# Altium PCB NB3000XN.PcbDoc (part 28 of 71)
Units mil, origin at the board's own origin, x right, y up, seen from the top; angles counter-clockwise.
Board outline 9527.56 x 6929.77 mil, 6 copper layers (Top Layer, GND+SHIELD, MidLayer1, MidLayer2, P2 - 3V3+5V0, Bottom Layer), stack 62.375 mil thick; 832 components, 1027 nets, 4655 pads, 4981 vias.
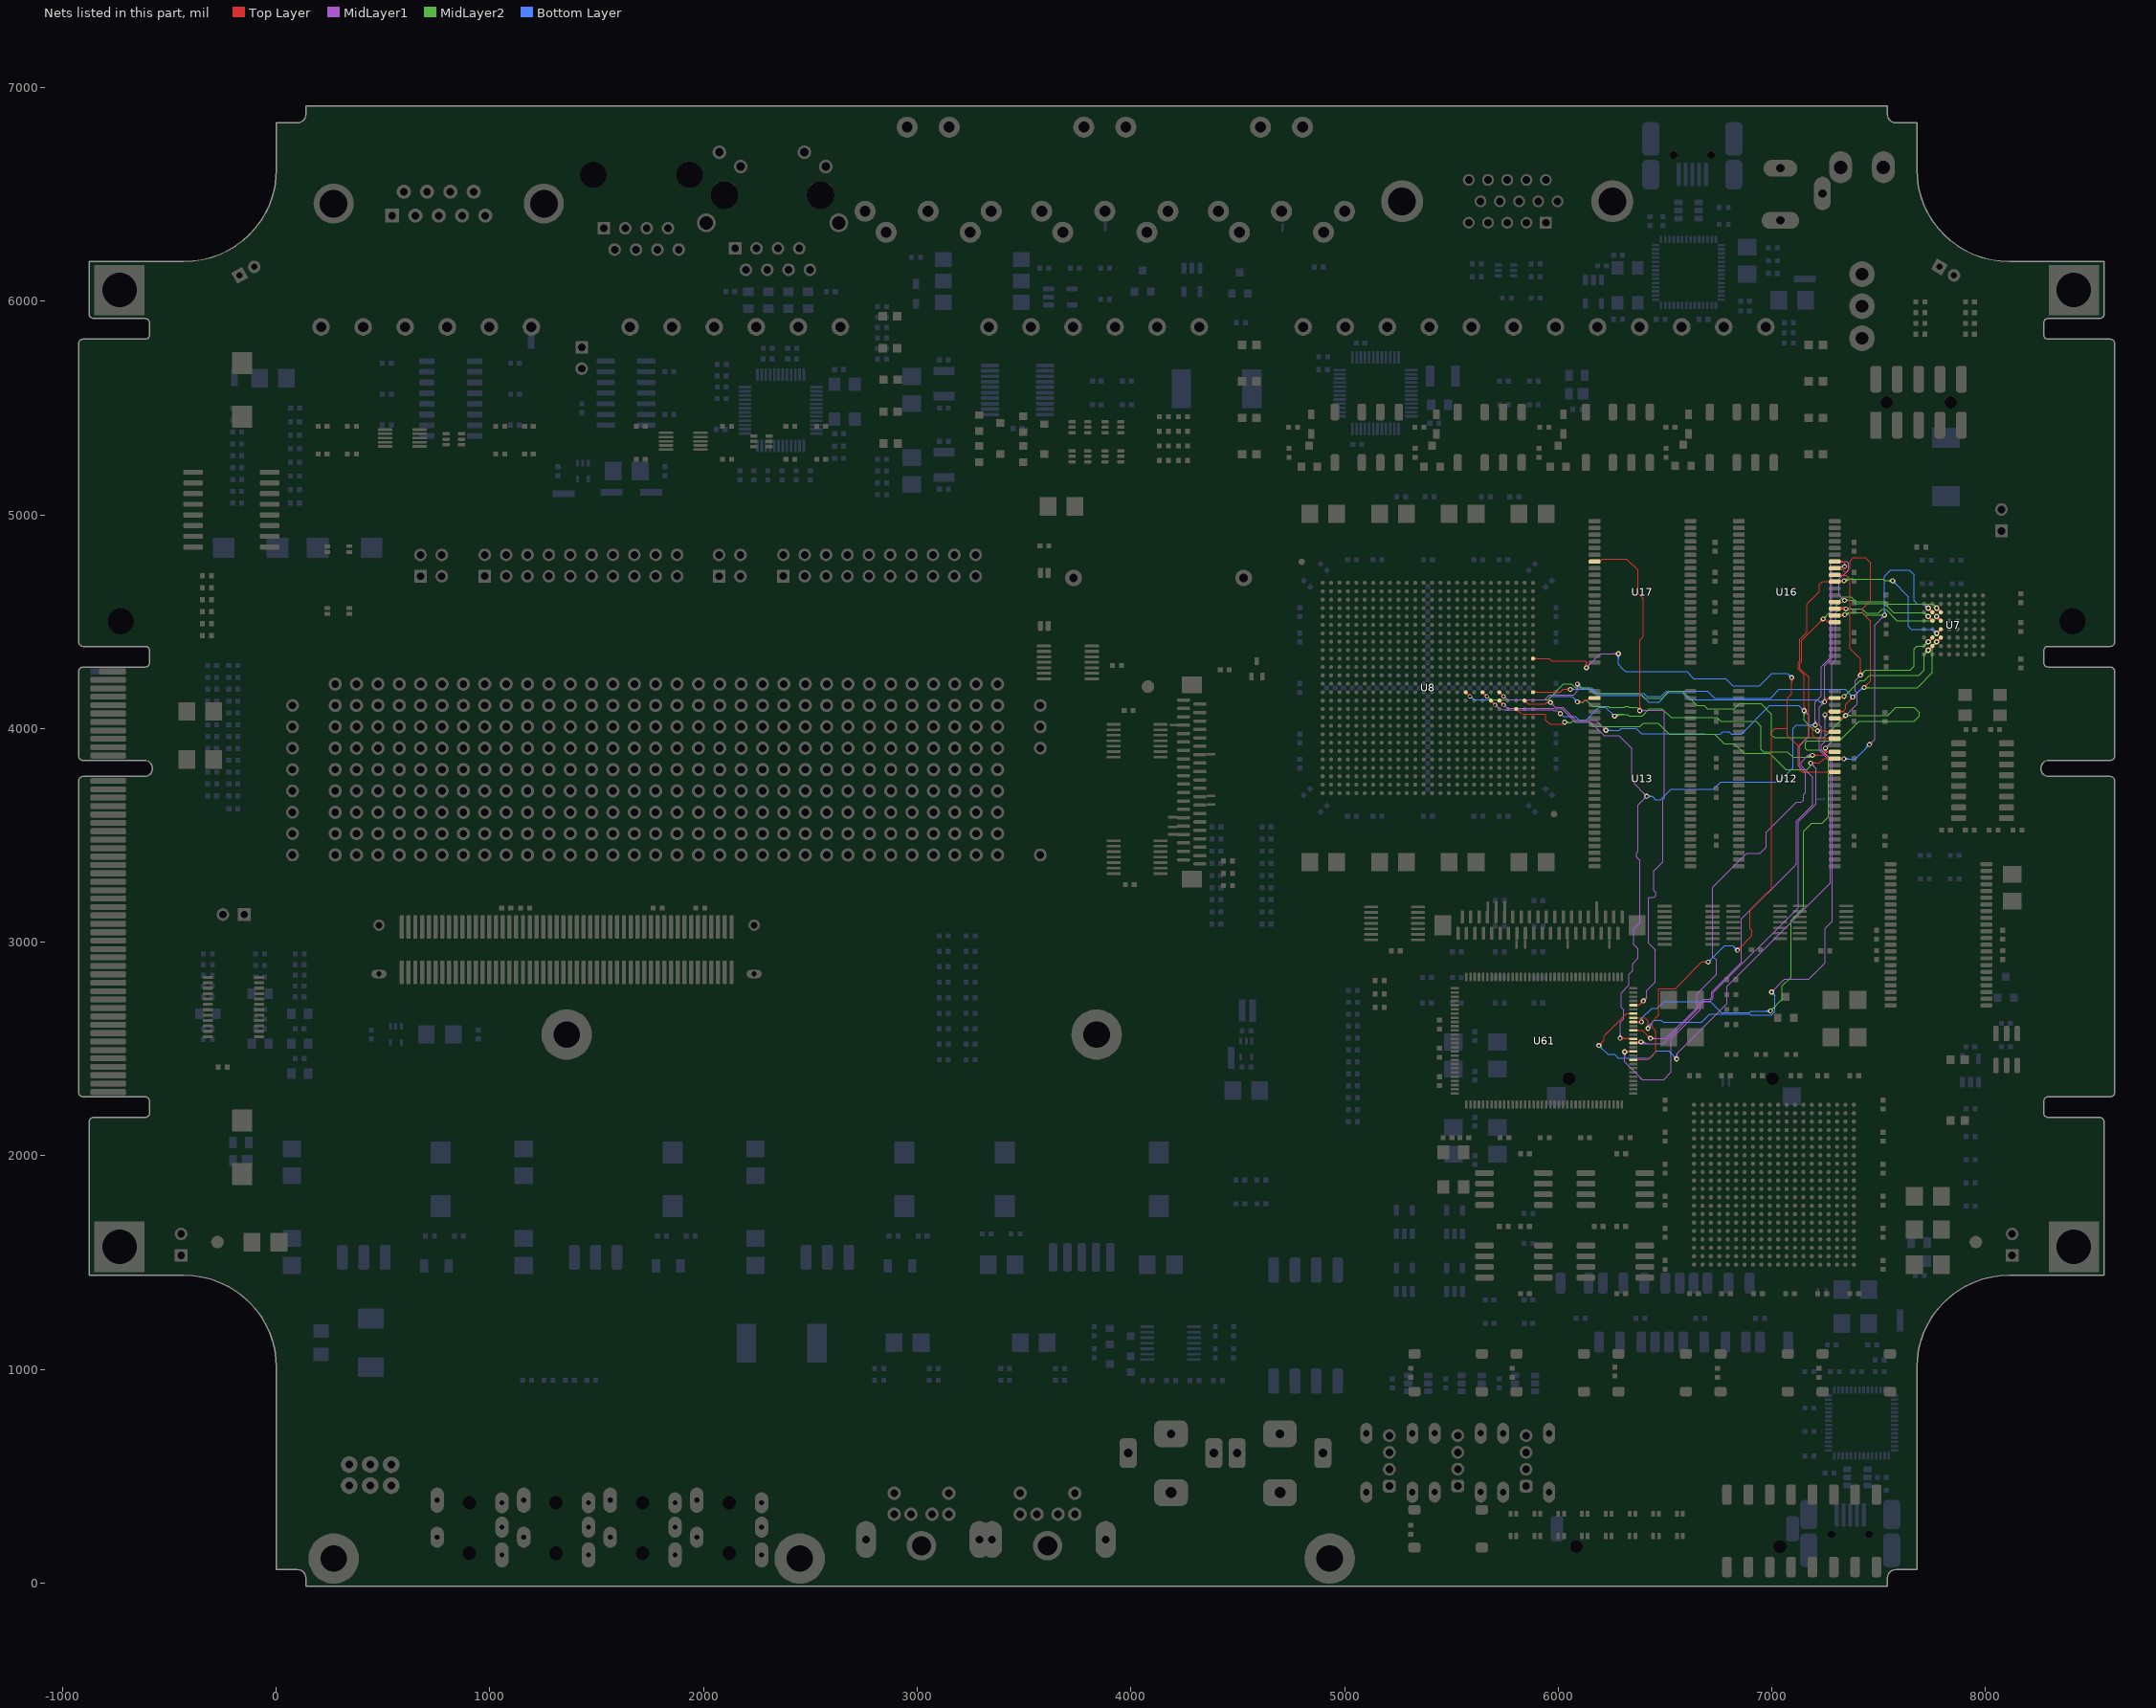
[diagram p32: the nets of this part, all layers, seen from the top]

## Via types
v1: diameter 23, hole 11.81, Top Layer to Bottom Layer, 3672 vias
v2: diameter 26, hole 11.81, Top Layer to Bottom Layer, 461 vias
v3: diameter 19, hole 11.81, Top Layer to Bottom Layer, tented both sides, 396 vias
v4: diameter 23.62, hole 11.81, Top Layer to Bottom Layer, 288 vias
v5: diameter 20, hole 11.81, Top Layer to Bottom Layer, 91 vias
v6: diameter 23, hole 11.81, Top Layer to Bottom Layer, tented both sides, 50 vias
v7: diameter 31, hole 11.81, Top Layer to Bottom Layer, 15 vias
v8: diameter 27.56, hole 11.81, Top Layer to Bottom Layer, tented both sides, 4 vias
v9: diameter 29, hole 11.81, Top Layer to Bottom Layer, 3 vias
v10: diameter 21, hole 11.81, Top Layer to Bottom Layer, 1 vias

## Nets (pads, with @x,y where several pads share a name; then routed paths per layer and width w, separated by ;. In a path a pad name is that pad's centre, name@x,y a point inside that pad or via, vN(x,y) a via of type N, cw(c..) or ccw(c..) an arc to the next point about the centre after c; other vN are vias at no path point) (continued)
DB_MEM.BUS_D8: U7.F3 U8.K26 U12.42 U16.29 U61.47 | length 6471.7
  Top Layer w4: U8.K26@5882.13,4327.8 5910,4327.8 5920,4327.8 5957.5,4327.8 5968.42,4316.87 6128.13,4316.87 6131.86,4313.14 v1(6131.86,4284.37) ; U8.K26@5887.43,4322.49 cw(c5900.23,4309.69) 5900.23,4327.8 cw(c5900.23,4345.9) U8.K26@5887.43,4333.1 ; v1@6125.14,4291.09 ccw(c6108.92,4307.31) 6131.86,4307.31 ccw(c6154.79,4307.31) v1@6138.57,4291.09 ; v1@6127.97,4288.26 ccw(c6118.58,4297.65) 6131.86,4297.65 ccw(c6145.14,4297.65) v1@6135.75,4288.26 ; U61.47@6356.86,2450.04 6420.04,2450.04 6456.86,2486.86 6456.86,2583.37 6440.19,2600.04 6440.19,2627.37 6471.19,2658.37 6471.19,2781.71 6472.86,2783.37 6548.52,2783.37 6672.52,2907.37 v1(6702.19,2907.37) ; U61.47@6367.95,2446.63 cw(c6376.19,2438.39) 6376.19,2450.04 ; U61.47@6367.95,2452.28 ccw(c6373.37,2457.7) 6373.37,2450.04 ; v1@6695.47,2900.66 ccw(c6679.26,2884.44) 6679.26,2907.37 ccw(c6679.26,2930.31) v1@6695.47,2914.09 ; v1@6698.3,2903.49 ccw(c6688.91,2894.1) 6688.91,2907.37 ccw(c6688.91,2920.65) v1@6698.3,2911.26 ; v1(6838.86,2962.37) 6906.86,3030.37 6906.86,3055 6898.52,3063.33 6898.52,3150.04 6998.52,3250.04 6998.52,3983.37 7015.19,4000.04 7073.52,4000.04 ; v1@6838.86,2967.87 ccw(c6838.86,2981.15) 6848.25,2971.76 ccw(c6857.64,2962.37) v1@6844.36,2962.37 ; v1@6838.86,2971.87 ccw(c6838.86,2994.81) 6855.07,2978.59 ccw(c6871.29,2962.37) v1@6848.36,2962.37 ; v1@7086.47,4231.99 cw(c7070.26,4215.77) 7093.19,4215.77 cw(c7116.13,4215.77) v1@7099.91,4231.99 ; v1@7089.3,4234.82 cw(c7079.91,4225.43) 7093.19,4225.43 cw(c7106.47,4225.43) v1@7097.08,4234.82 ; v1(7093.19,4238.71) 7093.19,4161.37 7073.52,4141.71 7073.52,4000.04 ; v1@7230.69,4513.04 cw(c7207.76,4513.04) 7223.97,4496.82 cw(c7240.19,4480.61) v1@7240.19,4503.54 ; v1@7234.69,4513.04 cw(c7221.41,4513.04) 7230.8,4503.65 cw(c7240.19,4494.26) v1@7240.19,4507.54 ; v1@7240.33,4511.55 cw(c7242.12,4492.78) 7255.45,4506.11 ; v1@7240.71,4507.57 cw(c7243.17,4481.82) 7261.46,4500.11 ; U16.29@7269.85,4494.4 ccw(c7263.3,4490.79) 7263.3,4498.27 ; U16.29@7269.85,4502.13 cw(c7263.3,4505.75) 7263.3,4498.27 ; U12.42@7271.19,3790.84 ccw(c7257.54,3777.18) 7257.54,3796.5 ccw(c7257.54,3815.81) U12.42@7271.19,3802.15 ; U12.42@7294.41,3796.5 7139.86,3796.5 7131.86,3804.5 7131.86,3908.37 ; U16.29@7294.41,4498.27 7263.3,4498.27 ; 5899.85,4327.8 ccw(c5899.85,4310.07) 5887.32,4322.6 cw(c5899.85,4310.07) 5899.85,4327.8 ; 5899.85,4327.8 cw(c5899.85,4345.52) 5887.32,4332.99 ccw(c5899.85,4345.52) 5899.85,4327.8 ; 7073.52,4000.04 7073.52,3966.71 7123.19,3917.04 ; 7123.19,3917.04 7131.86,3908.37 ; 7123.19,3917.04 7131.86,3908.37 ; 7123.19,3917.04 7173.52,3967.37 7173.52,4240.04 7131.86,4281.71 7131.86,4306.04 7140.19,4314.37 7140.19,4413.04 v1(7240.19,4513.04) 7248.52,4513.04 7263.3,4498.27
  Top Layer w8: v2@7771.26,4554.74 cw(c7771.26,4533.01) 7786.62,4548.38 cw(c7801.99,4563.74) v2@7780.26,4563.74 ; v2(7771.26,4563.74) U7.F3@7790.95,4544.06 ; U7.F3@7784.95,4544.06 ccw(c7770.46,4544.06) 7780.7,4554.3 ccw(c7790.95,4564.54) U7.F3@7790.95,4550.06
  MidLayer1 w4: v1(6131.86,4284.37) 6197.52,4350.04 v1(6281.86,4350.04) ; v1@6131.86,4289.87 ccw(c6131.86,4303.15) 6141.25,4293.76 ccw(c6150.64,4284.37) v1@6137.36,4284.37 ; v1@6131.86,4293.87 ccw(c6131.86,4316.81) 6148.07,4300.59 ccw(c6164.29,4284.37) v1@6141.36,4284.37 ; v1@6275.14,4343.32 ccw(c6258.92,4327.11) 6258.92,4350.04 ccw(c6258.92,4372.98) v1@6275.14,4356.76 ; v1@6277.97,4346.15 ccw(c6268.58,4336.76) 6268.58,4350.04 ccw(c6268.58,4363.32) v1@6277.97,4353.93
  MidLayer2 w4: v1(7240.19,4513.04) 7316.14,4588.99 7316.14,4601.99 7331.86,4617.71 7370.61,4617.71 7394.61,4593.71 7531.23,4593.71 7541.57,4583.37 7751.63,4583.37 v2(7771.26,4563.74) ; v1@7240.19,4518.54 ccw(c7240.19,4531.82) 7249.58,4522.43 ccw(c7258.97,4513.04) v1@7245.69,4513.04 ; v1@7240.19,4522.54 ccw(c7240.19,4545.48) 7256.41,4529.26 ccw(c7272.63,4513.04) v1@7249.69,4513.04 ; v2@7760.26,4563.74 ccw(c7733.7,4563.74) 7752.48,4582.52 ccw(c7771.26,4601.3) v2@7771.26,4574.74 ; v2@7764.26,4563.74 ccw(c7747.36,4563.74) 7759.31,4575.69 ccw(c7771.26,4587.64) v2@7771.26,4570.74
  Bottom Layer w4: v1@6275.14,4343.32 cw(c6258.92,4327.11) 6281.86,4327.11 cw(c6304.79,4327.11) v1@6288.57,4343.32 ; v1@6277.97,4346.15 cw(c6268.58,4336.76) 6281.86,4336.76 cw(c6295.14,4336.76) v1@6285.75,4346.15 ; v1(6281.86,4350.04) 6281.86,4300.04 6298.52,4283.37 6315.52,4266.37 6602.19,4266.37 6634.19,4234.37 6783.84,4234.37 6818.17,4200.04 6941.86,4200.04 7000.19,4258.37 7073.52,4258.37 v1(7093.19,4238.71) ; v1(6702.19,2907.37) 6774.52,2979.71 6778.52,2983.71 6817.52,2983.71 v1(6838.86,2962.37) ; v1@6702.19,2912.87 ccw(c6702.19,2926.15) 6711.58,2916.76 ccw(c6720.97,2907.37) v1@6707.69,2907.37 ; v1@6702.19,2916.87 ccw(c6702.19,2939.81) 6718.41,2923.59 ccw(c6734.63,2907.37) v1@6711.69,2907.37 ; v1@6829.36,2962.37 ccw(c6806.42,2962.37) 6822.64,2978.59 ccw(c6838.86,2994.81) v1@6838.86,2971.87 ; v1@6833.36,2962.37 ccw(c6820.08,2962.37) 6829.47,2971.76 ccw(c6838.86,2981.15) v1@6838.86,2967.87 ; v1@7083.69,4238.71 ccw(c7060.76,4238.71) 7076.97,4254.93 ccw(c7093.19,4271.14) v1@7093.19,4248.21 ; v1@7087.69,4238.71 ccw(c7074.41,4238.71) 7083.8,4248.1 ccw(c7093.19,4257.49) v1@7093.19,4244.21
DB_MEM.BUS_D9: U7.G3 U8.T24 U12.44 U16.30 U61.49 | length 6555.2
  Top Layer w4: U8.T24@5803.39,4084.23 cw(c5803.39,4066.51) 5815.92,4079.04 ; U8.T24@5810.73,4091.57 ccw(c5828.45,4091.57) 5815.92,4079.04 ; v1(6030,4030) 6020,4020 5961.9,4020 5942.36,4039.54 5942.36,4063.22 5937.86,4067.71 5920,4067.71 5910,4067.71 5843.27,4067.71 cw(c5843.27,4106.39) 5815.92,4079.04 ; v1(6311.19,2487.04) 6312.98,2488.83 U61.49@6351.93,2488.83 ; v1@6315.08,2483.15 cw(c6328.78,2469.45) 6328.78,2488.83 ; v1@6317.91,2480.32 cw(c6338.43,2459.8) U61.49@6338.43,2488.83 ; v1@6317.91,2493.76 ccw(c6329.82,2505.67) 6329.82,2488.83 ; U61.49@6335.91,2486 ccw(c6329.08,2479.17) 6329.08,2488.83 ccw(c6329.08,2498.48) U61.49@6335.91,2491.65 ; v1(7181.86,3838.71) 7223.71,3838.71 7244.49,3859.49 U12.44@7294.41,3859.49 ; v1@7185.75,3834.82 cw(c7195.14,3825.43) 7195.14,3838.71 cw(c7195.14,3851.99) v1@7185.75,3842.6 ; v1@7188.57,3831.99 cw(c7204.79,3815.77) 7204.79,3838.71 cw(c7204.79,3861.64) v1@7188.57,3845.43 ; U12.44@7271.19,3853.83 ccw(c7257.54,3840.17) 7257.54,3859.49 ccw(c7257.54,3878.8) U12.44@7271.19,3865.15 ; U12.44@7291.3,3859.49 7332.52,3859.49 7333.64,3858.37 v1(7337.52,3858.37) ; U16.30@7294.41,4529.76 7335.14,4529.76 7340.52,4524.37 v1(7340.52,4532.71) ; U16.30@7310.48,4529.76 ccw(c7310.48,4562.75) v1@7333.81,4539.43 ; U12.44@7311.9,3859.49 cw(c7311.9,3832.75) v1@7330.81,3851.66 ; U12.44@7317.28,3859.49 ccw(c7317.28,3878.62) v1@7330.81,3865.09 ; U12.44@7317.63,3853.83 cw(c7331.28,3840.18) 7331.28,3859.49 cw(c7331.28,3878.8) U12.44@7317.63,3865.15 ; U16.30@7317.63,4524.11 cw(c7331.28,4510.45) 7331.28,4529.76 cw(c7331.28,4549.08) U16.30@7317.63,4535.42 ; U16.30@7320.14,4529.76 ccw(c7320.14,4553.09) v1@7336.64,4536.6 ; U12.44@7321.56,3859.49 cw(c7321.56,3842.41) v1@7333.64,3854.49 ; 7324.7,4529.76 cw(c7324.7,4516.88) v1@7333.81,4525.99
  Top Layer w8: v2@7731.89,4554.74 cw(c7731.89,4533.01) 7747.25,4548.38 cw(c7762.62,4563.74) v2@7740.89,4563.74 ; v2(7731.89,4563.74) U7.G3@7751.58,4544.06 ; U7.G3@7745.58,4544.06 ccw(c7731.09,4544.06) 7741.33,4554.3 ccw(c7751.58,4564.54) U7.G3@7751.58,4550.06
  MidLayer1 w4: v1@6304.47,2480.32 cw(c6288.26,2464.11) 6311.19,2464.11 cw(c6334.13,2464.11) v1@6317.91,2480.32 ; v1@6306.86,2482.71 v1(6311.19,2487.04) 6311.19,2438.81 6391.63,2358.37 ; v1@6307.3,2483.15 cw(c6297.91,2473.76) 6311.19,2473.76 cw(c6324.47,2473.76) v1@6315.08,2483.15 ; 6381.4,2368.6 6391.96,2358.04 6493.88,2358.04 6529.19,2393.35 6529.19,2547.37 6665.19,2683.37 6665.19,2705.39 6685.17,2725.37 6712.84,2725.37 ; 6695.19,2725.04 6712.5,2725.04 6712.84,2725.37 ; v1@7181.86,3829.21 cw(c7181.86,3806.27) 7198.07,3822.49 cw(c7214.29,3838.71) v1@7191.36,3838.71 ; v1@7181.86,3833.21 cw(c7181.86,3819.93) 7191.25,3829.32 cw(c7200.64,3838.71) v1@7187.36,3838.71 ; v1(7181.86,3838.71) 7206.86,3813.71 7206.86,3670 7206.86,3647.06 7123.52,3563.73 7123.52,3541.71 7123.52,3535 7123.52,3161.37 6725.86,2763.71 6725.86,2738.39 6712.84,2725.37 ; v1(7456.86,3925.04) 7481.86,3950.04 7481.86,4484.71 v1(7527.86,4530.71) ; v1@7456.86,3930.54 ccw(c7456.86,3943.82) 7466.25,3934.43 ccw(c7475.64,3925.04) v1@7462.36,3925.04 ; v1@7456.86,3934.54 ccw(c7456.86,3957.48) 7473.07,3941.26 ccw(c7489.29,3925.04) v1@7466.36,3925.04 ; v1@7518.36,4530.71 cw(c7495.42,4530.71) 7511.64,4514.49 cw(c7527.86,4498.27) v1@7527.86,4521.21 ; v1@7522.36,4530.71 cw(c7509.08,4530.71) 7518.47,4521.32 cw(c7527.86,4511.93) v1@7527.86,4525.21
  MidLayer2 w4: v1(6030,4030) 6040,4030 6041.29,4028.71 6060.52,4028.71 6065.19,4033.37 6140.19,4033.37 6163.19,4010.37 6382.52,4010.37 6397.52,4025.37 6467.67,4025.37 6518.33,3974.71 6732.19,3974.71 6776.9,3930 6825,3930 6871.63,3883.37 6990.19,3883.37 7065.19,3808.37 7165.19,3808.37 7181.86,3825.04 v1(7181.86,3838.71) ; v1@6033.89,4033.89 ccw(c6046.4,4046.4) 6046.4,4028.71 ; v1@6036.72,4023.28 cw(c6049.82,4010.18) 6049.82,4028.71 ; v1@6036.72,4036.72 ccw(c6056.05,4056.05) 6056.05,4028.71 ; v1@7338.76,4534.48 cw(c7356.22,4517.02) 7356.22,4541.71 ; v1(7340.52,4532.71) 7349.52,4541.71 7423.52,4541.71 7434.52,4530.71 v1(7527.86,4530.71) ; v1@7341.58,4531.65 cw(c7365.87,4507.36) 7365.87,4541.71 ; v1@7344.41,4528.82 cw(c7375.53,4497.7) 7375.53,4541.71 ; v1@7347.24,4525.99 cw(c7385.19,4488.04) 7385.19,4541.71 ; v1@7521.14,4523.99 ccw(c7504.92,4507.77) 7504.92,4530.71 ccw(c7504.92,4553.64) v1@7521.14,4537.43 ; v1@7523.97,4526.82 ccw(c7514.58,4517.43) 7514.58,4530.71 ccw(c7514.58,4543.99) v1@7523.97,4534.6
  Bottom Layer w4: v1(7337.52,3858.37) 7390.19,3858.37 v1(7456.86,3925.04) ; v1@7341.41,3854.49 cw(c7350.8,3845.1) 7350.8,3858.37 cw(c7350.8,3871.65) v1@7341.41,3862.26 ; v1@7344.24,3851.66 cw(c7360.46,3835.44) 7360.46,3858.37 cw(c7360.46,3881.31) v1@7344.24,3865.09 ; v1@7447.36,3925.04 cw(c7424.42,3925.04) 7440.64,3908.82 cw(c7456.86,3892.61) v1@7456.86,3915.54 ; v1@7451.36,3925.04 cw(c7438.08,3925.04) 7447.47,3915.65 cw(c7456.86,3906.26) v1@7456.86,3919.54 ; v1@7521.14,4537.43 ccw(c7504.92,4553.64) 7527.86,4553.64 ccw(c7550.79,4553.64) v1@7534.57,4537.43 ; v1@7523.97,4534.6 ccw(c7514.58,4543.99) 7527.86,4543.99 ccw(c7541.14,4543.99) v1@7531.75,4534.6 ; v1(7527.86,4530.71) 7527.86,4712.71 7556.86,4741.71 7644.19,4741.71 7665.19,4720.71 7665.19,4597.71 7679.52,4583.37 7712.26,4583.37 v2(7731.89,4563.74) ; v2@7720.89,4563.74 ccw(c7694.33,4563.74) 7713.11,4582.52 ccw(c7731.89,4601.3) v2@7731.89,4574.74 ; v2@7724.89,4563.74 ccw(c7707.99,4563.74) 7719.94,4575.69 ccw(c7731.89,4587.64) v2@7731.89,4570.74
DB_MEM.BUS_D10: U7.F4 U8.R21 U12.45 U16.31 U61.51 | length 6324.8
  Top Layer w4: U8.R21@5685.28,4123.44 cw(c5685.28,4105.34) 5698.08,4118.14 cw(c5710.88,4130.94) U8.R21@5692.78,4130.94 ; U8.R21@5685.28,4123.6 cw(c5685.28,4105.88) 5697.81,4118.41 cw(c5710.34,4130.94) U8.R21@5692.62,4130.94 ; U8.R21@5685.28,4130.94 v3(5704.96,4111.26) ; U61.51@6361.54,2528.2 ccw(c6361.54,2558.84) v1@6383.29,2537.25 ; U61.51@6367.95,2525.37 cw(c6374.78,2518.54) 6374.78,2528.2 cw(c6374.78,2537.85) U61.51@6367.95,2531.02 ; 6371.15,2528.2 ccw(c6371.15,2549.3) v1@6386.13,2534.43 ; 6376.76,2528.2 cw(c6376.76,2522.94) v1@6380.47,2526.66 ; v1@6380.45,2540.07 cw(c6351.93,2568.37) U61.51@6351.93,2528.2 v1@6384.04,2528.2 ; v1(7190.19,3875.04) 7241.25,3875.04 7250.52,3884.32 ; v1@7194.08,3871.15 cw(c7203.47,3861.76) 7203.47,3875.04 cw(c7203.47,3888.32) v1@7194.08,3878.93 ; v1@7196.91,3868.32 cw(c7213.13,3852.11) 7213.13,3875.04 cw(c7213.13,3897.98) v1@7196.91,3881.76 ; v1@7243.81,3901.66 cw(c7227.59,3885.44) 7250.52,3885.44 cw(c7273.46,3885.44) v1@7257.24,3901.66 ; v1@7246.64,3904.49 cw(c7237.25,3895.1) 7250.52,3895.1 cw(c7263.8,3895.1) v1@7254.41,3904.49 ; v1(7250.52,3908.37) 7250.52,3884.32 ; U12.45@7271.19,3885.33 ccw(c7257.54,3871.67) 7257.54,3890.98 ccw(c7257.54,3910.3) U12.45@7271.19,3896.64 ; U12.45@7294.41,3890.98 7257.19,3890.98 7250.52,3884.32 ; U16.31@7299.86,4566.71 v1@7340.52,4566.71 ; U16.31@7308.16,4566.71 cw(c7308.16,4521.01) v1@7340.47,4553.32 ; U16.31@7311.97,4561.26 cw(c7323.54,4551.7) 7323.54,4566.71 ; U16.31@7315.05,4558.71 cw(c7332.03,4544.69) 7332.03,4566.71 ; U16.31@7317.82,4566.71 cw(c7317.82,4530.67) v1@7343.3,4556.15 ; U16.31@7318.14,4556.16 cw(c7340.52,4537.67) v1@7340.52,4566.71 ; 7327.47,4566.71 cw(c7327.47,4540.32) v1@7346.13,4558.98 ; 7337.13,4566.71 cw(c7337.13,4549.98) v1@7348.96,4561.81 ; v1(7347.19,4560.04) v1@7340.52,4566.71 ; 5692.16,4124.06 cw(c5679.35,4111.26) 5697.46,4111.26 ccw(c5679.35,4111.26) 5692.16,4124.06 ; 5692.16,4124.06 ccw(c5704.96,4136.87) 5704.96,4118.76 cw(c5704.96,4136.87) 5692.16,4124.06
  Top Layer w8: v2@7771.26,4515.37 cw(c7771.26,4493.64) 7786.62,4509.01 cw(c7801.99,4524.37) v2@7780.26,4524.37 ; v2(7771.26,4524.37) U7.F4@7790.95,4504.69 ; U7.F4@7784.95,4504.69 ccw(c7770.46,4504.69) 7780.7,4514.93 ccw(c7790.95,4525.17) U7.F4@7790.95,4510.69
  MidLayer1 w4: v3@5705.61,4103.79 cw(c5707.19,4085.75) 5718.83,4099.62 ; v3@5712.43,4111.91 ccw(c5730.47,4113.49) 5718.83,4099.62 ; 5781.77,4087.4 5767.84,4087.4 ; v1@6010.54,4071.35 6010,4070.81 v1(6010,4070) 5996.29,4083.71 5979.9,4083.71 5976.21,4087.4 5924.74,4087.4 5920,4087.4 5910,4087.4 5861.38,4087.4 5841.96,4087.4 5767.84,4087.4 ; v1@6385.42,2531.61 ccw(c6401.27,2547.46) 6401.27,2525.04 ; v1(6387.19,2533.37) 6395.52,2525.04 6491.86,2525.04 6656.86,2690.04 6656.86,2708.37 6681.86,2733.37 6709.52,2733.37 6717.86,2741.71 6717.86,2767.02 6856.86,2906.02 6856.86,3108.37 7098.52,3350.04 7115.52,3367.04 7115.52,3567.04 ; v1@6388.25,2534.44 ccw(c6410.93,2557.12) 6410.93,2525.04 ; v1@6391.08,2537.26 ccw(c6420.59,2566.77) 6420.59,2525.04 ; v1@6393.91,2540.09 ccw(c6430.25,2576.43) 6430.25,2525.04 ; v1@7182.9,3868.95 ccw(c7169.86,3858.03) 7169.86,3875.04 ; v1@7182.9,3881.14 cw(c7169.86,3892.05) 7169.86,3875.04 ; v1@7185.97,3871.51 ccw(c7178.42,3865.19) 7178.42,3875.04 ccw(c7178.42,3884.89) v1@7185.97,3878.57 ; v1(7190.19,3875.04) 7169.86,3875.04 ; v1(7250.52,3908.37) 7281.86,3939.71 7281.86,4303.33 7298.52,4320 7298.52,4541.71 7316.86,4560.04 v1(7347.19,4560.04) ; v1@7250.52,3913.87 ccw(c7250.52,3927.15) 7259.91,3917.76 ccw(c7269.3,3908.37) v1@7256.02,3908.37 ; v1@7250.52,3917.87 ccw(c7250.52,3940.81) 7266.74,3924.59 ccw(c7282.96,3908.37) v1@7260.02,3908.37 ; v1@7340.47,4553.32 ccw(c7324.26,4537.11) 7324.26,4560.04 ccw(c7324.26,4582.98) v1@7340.47,4566.76 ; v1@7343.3,4556.15 ccw(c7333.91,4546.76) 7333.91,4560.04 ccw(c7333.91,4573.32) v1@7343.3,4563.93 ; 5718.83,4099.62 ccw(c5748.34,4129.13) 5748.34,4087.4 5767.84,4087.4 ; 7115.52,3567.04 7190.19,3641.71 ; 7115.52,3567.04 7190.19,3641.71 ; 7169.86,3875.04 7136.52,3841.71 7136.52,3825.04 7190.19,3771.37 7190.19,3641.71
  MidLayer2 w4: v1@6262.42,4060.14 cw(c6278.27,4044.29) 6278.27,4066.71 ; v1(6264.19,4058.37) 6272.52,4066.71 6323.52,4066.71 6330.23,4060 6393.52,4060 6425.91,4092.38 6486.54,4092.38 6527.54,4051.37 6685,4051.37 6743.86,4051.37 6761.86,4033.37 6926.63,4033.37 6950,4010 6950,3901.71 6960,3891.71 7073.52,3891.71 7098.52,3866.71 7181.86,3866.71 v1(7190.19,3875.04) ; v1@6265.25,4057.31 cw(c6287.93,4034.64) 6287.93,4066.71 ; v1@6268.08,4054.49 cw(c6297.59,4024.98) 6297.59,4066.71 ; v1@6270.91,4051.66 cw(c6307.24,4015.32) 6307.24,4066.71 ; 7147.14,3866.71 ccw(c7147.14,3918.09) v1@7183.47,3881.76 ; 7156.79,3866.71 ccw(c7156.79,3908.44) v1@7186.3,3878.93 ; 7166.45,3866.71 ccw(c7166.45,3898.78) v1@7189.13,3876.1 ; 7176.11,3866.71 ccw(c7176.11,3889.12) v1@7191.96,3873.27 ; v1(7347.19,4560.04) 7421.86,4560.04 7441.52,4540.37 7497.19,4540.37 7515.04,4558.23 7532.77,4558.23 7585.96,4505.04 7760.19,4505.04 7765.19,4510.04 v2@7765.19,4524.37 ; v1@7351.08,4556.15 cw(c7360.47,4546.76) 7360.47,4560.04 cw(c7360.47,4573.32) v1@7351.08,4563.93 ; v1@7353.91,4553.32 cw(c7370.13,4537.11) 7370.13,4560.04 cw(c7370.13,4582.98) v1@7353.91,4566.76
  Bottom Layer w4: v1(6010,4070) 6010,4070.81 6010.54,4071.35 6024.71,4057.19 6079.71,4057.19 6095.19,4041.71 6131.86,4041.71 6190.19,4100.04 6222.52,4100.04 v1(6264.19,4058.37) ; v1@6254.69,4058.37 ccw(c6231.76,4058.37) 6247.97,4074.59 ccw(c6264.19,4090.81) v1@6264.19,4067.87 ; v1@6258.69,4058.37 ccw(c6245.41,4058.37) 6254.8,4067.76 ccw(c6264.19,4077.15) v1@6264.19,4063.87
DB_MEM.BUS_D11: U7.G4 U8.R22 U12.47 U16.32 U61.52 | length 5865.6
  Top Layer w4: U8.R22@5724.65,4123.44 cw(c5724.65,4105.34) 5737.45,4118.14 cw(c5750.25,4130.94) U8.R22@5732.15,4130.94 ; U8.R22@5724.65,4123.6 cw(c5724.65,4105.88) 5737.18,4118.41 cw(c5749.71,4130.94) U8.R22@5731.99,4130.94 ; U8.R22@5724.65,4130.94 v3(5744.33,4111.26) ; v1(6290.19,2550.04) U61.52@6351.93,2550.04 ; v1@6294.08,2546.15 cw(c6303.47,2536.76) 6303.47,2550.04 cw(c6303.47,2563.32) v1@6294.08,2553.93 ; v1@6296.91,2543.32 cw(c6313.13,2527.11) 6313.13,2550.04 cw(c6313.13,2572.98) v1@6296.91,2556.76 ; 6323.87,2550.04 cw(c6323.87,2533.01) U61.52@6335.91,2545.05 ; v1(7203.52,4016.71) 7190.19,4003.37 7190.19,3969.81 7206.02,3953.98 U12.47@7294.41,3953.98 ; U12.47@7271.19,3948.32 ccw(c7257.54,3934.66) 7257.54,3953.98 ccw(c7257.54,3973.29) U12.47@7271.19,3959.63 ; U16.32@7294.41,4592.76 7323.14,4592.76 ; U16.32@7311.97,4592.76 cw(c7317.53,4586.17) 7323.64,4592.26 ; U16.32@7319.54,4590.18 cw(c7323.14,4588.95) 7323.14,4592.76 ; U16.32@7319.54,4595.33 ccw(c7323.14,4596.56) 7323.14,4592.76 ; v1(7340.19,4600.04) 7331.86,4591.71 7324.19,4591.71 7323.14,4592.76 ; 5731.53,4124.06 cw(c5718.72,4111.26) 5736.83,4111.26 ccw(c5718.72,4111.26) 5731.53,4124.06 ; 5731.53,4124.06 ccw(c5744.33,4136.87) 5744.33,4118.76 cw(c5744.33,4136.87) 5731.53,4124.06
  Top Layer w8: v2@7731.89,4515.37 cw(c7731.89,4493.64) 7747.25,4509.01 cw(c7762.62,4524.37) v2@7740.89,4524.37 ; v2(7731.89,4524.37) U7.G4@7751.58,4504.69 ; U7.G4@7745.58,4504.69 ccw(c7731.09,4504.69) 7741.33,4514.93 ccw(c7751.58,4525.17) U7.G4@7751.58,4510.69
  MidLayer1 w4: v3@5744.98,4103.79 cw(c5746.56,4085.75) 5758.2,4099.62 cw(c5769.84,4113.49) v3@5751.8,4111.91 ; 5757.91,4099.87 ccw(c5767.84,4109.8) 5767.84,4095.75 5861.38,4095.75 5910,4095.75 5920,4095.75 5924.74,4095.75 5979.17,4095.75 5983.21,4091.71 6018.52,4091.71 6073.66,4036.57 6080.36,4029.87 6152.75,4029.87 6195.62,3987.01 6195.62,3986.28 6215.19,3966.71 6283.86,3966.71 6344.52,3906.04 6344.52,3754.04 v1(6415.19,3683.37) 6373.52,3641.71 6373.52,3425.04 6367.19,3418.71 6367.19,3397.81 6382.86,3382.14 6382.86,3091.71 6353.52,3062.37 6353.52,2989.08 6373.52,2969.08 6373.52,2925.04 6348.52,2900.04 6348.52,2866.71 6331.86,2850.04 6331.86,2800.04 6295,2763.18 6295,2695.23 6306.86,2683.37 6306.86,2641.71 6290.19,2625.04 v1(6290.19,2550.04) ; v1@6283.47,2556.76 ccw(c6267.26,2572.98) 6290.19,2572.98 ccw(c6313.13,2572.98) v1@6296.91,2556.76 ; v1@6286.3,2553.93 ccw(c6276.91,2563.32) 6290.19,2563.32 ccw(c6303.47,2563.32) v1@6294.08,2553.93 ; v1@6415.19,3673.87 ccw(c6415.19,3650.94) 6398.97,3667.16 ccw(c6382.76,3683.37) 6405.69,3683.37 ccw(c6382.76,3683.37) 6398.97,3699.59 ccw(c6415.19,3715.81) v1@6415.19,3692.87 ; v1@6415.19,3677.87 ccw(c6415.19,3664.6) 6405.8,3673.99 ccw(c6396.41,3683.37) 6409.69,3683.37 ccw(c6396.41,3683.37) 6405.8,3692.76 ccw(c6415.19,3702.15) v1@6415.19,3688.87 ; v1@7196.81,4023.43 ccw(c7180.59,4039.64) 7203.52,4039.64 ccw(c7226.46,4039.64) v1@7210.24,4023.43 ; v1@7199.64,4020.6 ccw(c7190.25,4029.99) 7203.52,4029.99 ccw(c7216.8,4029.99) v1@7207.41,4020.6 ; v1(7203.52,4016.71) 7203.52,4125.04 7231.86,4153.37 7231.86,4290.37 7273.52,4332.04 7273.52,4768.04 7288.86,4783.37 7349.86,4783.37 7358.19,4775.04 7358.19,4741.71 7315.19,4698.71 7315.19,4625.04 v1(7340.19,4600.04) ; v1@7330.69,4600.04 ccw(c7307.76,4600.04) 7323.97,4616.26 ccw(c7340.19,4632.48) v1@7340.19,4609.54 ; v1@7334.69,4600.04 ccw(c7321.41,4600.04) 7330.8,4609.43 ccw(c7340.19,4618.82) v1@7340.19,4605.54
  MidLayer2 w4: v1(7340.19,4600.04) 7372,4600.04 7377,4600 7391.29,4585.71 7527.92,4585.71 7569.92,4543.71 7712.55,4543.71 v2(7731.89,4524.37) ; v1@7344.08,4596.15 cw(c7353.47,4586.76) 7353.47,4600.04 cw(c7353.47,4613.32) v1@7344.08,4603.93 ; v1@7346.91,4593.32 cw(c7363.13,4577.11) 7363.13,4600.04 cw(c7363.13,4622.98) v1@7346.91,4606.76 ; v2@7720.89,4524.37 ccw(c7694.33,4524.37) 7713.11,4543.15 ccw(c7731.89,4561.93) v2@7731.89,4535.37 ; v2@7724.89,4524.37 ccw(c7707.99,4524.37) 7719.94,4536.32 ccw(c7731.89,4548.27) v2@7731.89,4531.37
  Bottom Layer w4: v1(6415.19,3683.37) 6440.19,3683.37 6455.48,3668.09 6479.55,3668.09 6527.5,3716.04 6725.84,3716.04 6760.5,3750.71 7032.52,3750.71 7098.52,3816.71 7098.52,4000.04 7115.19,4016.71 v1(7203.52,4016.71) ; v1@6419.08,3679.49 cw(c6428.47,3670.1) 6428.47,3683.37 cw(c6428.47,3696.65) v1@6419.08,3687.26 ; v1@6421.91,3676.66 cw(c6438.13,3660.44) 6438.13,3683.37 cw(c6438.13,3706.31) v1@6421.91,3690.09 ; v1@7196.81,4009.99 ccw(c7180.59,3993.77) 7180.59,4016.71 ccw(c7180.59,4039.64) v1@7196.81,4023.43 ; v1@7199.64,4012.82 ccw(c7190.25,4003.43) 7190.25,4016.71 ccw(c7190.25,4029.99) v1@7199.64,4020.6
DB_MEM.BUS_D12: U7.F5 U8.R25 U12.48 U16.35 U61.54 | length 6312.6
  Top Layer w4: U8.R25@5842.76,4123.6 cw(c5842.76,4105.88) 5855.29,4118.41 ; U8.R25@5850.1,4130.94 ccw(c5867.83,4130.94) 5855.29,4118.41 ; v1@5955.85,4117.26 ccw(c5946.52,4111.31) 5946.52,4122.37 ; v1@5955.85,4127.49 cw(c5946.52,4133.44) 5946.52,4122.37 ; v1(5963.86,4122.37) 5946.52,4122.37 ; U61.54@6351.93,2587.25 6394.65,2587.25 v1(6431.86,2550.04) v1@6431.86,2558.37 ; U61.54@6367.95,2584.42 cw(c6374.78,2577.59) 6374.78,2587.25 cw(c6374.78,2596.91) U61.54@6367.95,2590.08 ; v1@6422.36,2550.04 ccw(c6399.42,2550.04) 6415.64,2566.26 ccw(c6431.86,2582.48) v1@6431.86,2559.54 ; v1@6426.36,2550.04 ccw(c6413.08,2550.04) 6422.47,2559.43 ccw(c6431.86,2568.82) v1@6431.86,2555.54 ; v1@7144.81,4090.09 ccw(c7128.59,4106.31) 7151.52,4106.31 ccw(c7174.46,4106.31) v1@7158.24,4090.09 ; v1@7147.64,4087.26 ccw(c7138.25,4096.65) 7151.52,4096.65 ccw(c7164.8,4096.65) v1@7155.41,4087.26 ; v1(7151.52,4083.37) 7151.52,4250.73 7123.52,4278.73 7123.52,4309.02 7131.86,4317.36 7131.86,4416.71 7165.19,4450.04 7165.19,4583.37 7223.52,4641.71 7223.52,4675.04 7235.73,4687.24 U16.35@7294.41,4687.24 7333.73,4687.24 v1(7338.19,4691.71) ; v1(7214.19,3989.71) 7252.29,3989.71 7256.52,3985.47 U12.48@7294.41,3985.47 ; v1@7218.08,3985.82 cw(c7227.47,3976.43) 7227.47,3989.71 cw(c7227.47,4002.99) v1@7218.08,3993.6 ; v1@7220.91,3982.99 cw(c7237.13,3966.77) 7237.13,3989.71 cw(c7237.13,4012.64) v1@7220.91,3996.43 ; U12.48@7271.19,3979.82 ccw(c7257.54,3966.16) 7257.54,3985.47 ccw(c7257.54,4004.79) U12.48@7271.19,3991.13 ; U16.35@7271.19,4681.59 ccw(c7257.54,4667.93) 7257.54,4687.24 ccw(c7257.54,4706.56) U16.35@7271.19,4692.9 ; U16.35@7304.48,4687.24 ccw(c7304.48,4725.42) v1@7331.47,4698.43 ; U16.35@7314.13,4687.24 ccw(c7314.13,4715.76) v1@7334.3,4695.6 ; U16.35@7317.63,4681.59 cw(c7331.28,4667.93) 7331.28,4687.24 cw(c7331.28,4706.56) U16.35@7317.63,4692.9 ; 7323.79,4687.24 ccw(c7323.79,4706.11) v1@7337.13,4692.77 ; 7326.03,4687.24 cw(c7326.03,4679.55) v1@7331.47,4684.99 ; 5855.29,4118.41 ccw(c5862.47,4125.59) 5862.47,4115.44 5910,4115.44 5920,4115.44 5924.74,4115.44 5939.59,4115.44 5946.52,4122.37
  Top Layer w8: v2(7771.26,4445.63) U7.F5@7790.95,4465.32 ; v2@7771.26,4454.63 ccw(c7771.26,4476.36) 7786.62,4460.99 ccw(c7801.99,4445.63) v2@7780.26,4445.63 ; U7.F5@7784.95,4465.32 cw(c7770.46,4465.32) 7780.7,4455.07 cw(c7790.95,4444.83) U7.F5@7790.95,4459.32
  MidLayer1 w4: v1@5963.86,4112.87 cw(c5963.86,4089.94) 5980.07,4106.16 cw(c5996.29,4122.37) v1@5973.36,4122.37 ; v1@5963.86,4116.87 cw(c5963.86,4103.6) 5973.25,4112.99 cw(c5982.64,4122.37) v1@5969.36,4122.37 ; v1(5963.86,4122.37) 5986.19,4100.04 6021.52,4100.04 6083.69,4037.87 6177.36,4037.87 6181.19,4034.04 v1(6223.52,3991.71) ; v1@6214.02,3991.71 ccw(c6191.09,3991.71) 6207.31,4007.93 ccw(c6223.52,4024.14) v1@6223.52,4001.21 ; v1@6218.02,3991.71 ccw(c6204.75,3991.71) 6214.13,4001.1 ccw(c6223.52,4010.49) v1@6223.52,3997.21 ; v1(6431.86,2550.04) 6504.86,2550.04 6648.52,2693.71 6648.52,2758.37 6740.19,2850.04 6740.19,2916.71 6723.52,2933.37 6723.52,3258.37 6881.86,3416.71 6935,3416.71 6945.23,3416.71 6973.52,3445 6973.52,3513.73 7114.89,3655.09 7138.24,3655.09 7148.52,3665.37 7148.52,3691.71 7156.86,3700.04 7156.86,3791.71 7123.52,3825.04 7123.52,3913.37 7173.52,3963.37 7173.52,4061.37 v1(7151.52,4083.37) ; v1@6435.75,2546.15 cw(c6445.14,2536.76) 6445.14,2550.04 cw(c6445.14,2563.32) v1@6435.75,2553.93 ; v1@6438.57,2543.32 cw(c6454.79,2527.11) 6454.79,2550.04 cw(c6454.79,2572.98) v1@6438.57,2556.76 ; v1@7151.52,4073.87 cw(c7151.52,4050.94) 7167.74,4067.16 cw(c7183.96,4083.37) v1@7161.02,4083.37 ; v1@7151.52,4077.87 cw(c7151.52,4064.6) 7160.91,4073.99 cw(c7170.3,4083.37) v1@7157.02,4083.37
  MidLayer2 w4: v1@7144.81,4076.66 cw(c7128.59,4060.44) 7151.52,4060.44 cw(c7174.46,4060.44) v1@7158.24,4076.66 ; v1@7147.64,4079.49 cw(c7138.25,4070.1) 7151.52,4070.1 cw(c7164.8,4070.1) v1@7155.41,4079.49 ; v1(7151.52,4083.37) 7151.52,4038.71 7200.52,3989.71 v1(7214.19,3989.71) ; v1@7336.42,4693.48 cw(c7352.27,4677.63) 7352.27,4700.04 ; v1(7338.19,4691.71) 7346.52,4700.04 7520,4700.04 7528.33,4691.71 v1(7565.19,4691.71) ; v1@7339.25,4690.65 cw(c7361.93,4667.97) 7361.93,4700.04 ; v1@7342.08,4687.82 cw(c7371.59,4658.31) 7371.59,4700.04 ; v1@7344.91,4684.99 cw(c7381.24,4648.66) 7381.24,4700.04 ; v1@7558.47,4684.99 ccw(c7542.26,4668.77) 7542.26,4691.71 ccw(c7542.26,4714.64) v1@7558.47,4698.43 ; v1@7561.3,4687.82 ccw(c7551.91,4678.43) 7551.91,4691.71 ccw(c7551.91,4704.99) v1@7561.3,4695.6
  Bottom Layer w4: v1(6223.52,3991.71) 6286.67,3991.71 6295,4000.04 6365.19,4000.04 6390.19,3975.04 6686.86,3975.04 ; v1@6227.41,3987.82 cw(c6236.8,3978.43) 6236.8,3991.71 cw(c6236.8,4004.99) v1@6227.41,3995.6 ; v1@6230.24,3984.99 cw(c6246.46,3968.77) 6246.46,3991.71 cw(c6246.46,4014.64) v1@6230.24,3998.43 ; 6685,3975 6760,3975 6770,3985 6800,3985 6810,3975 6856.82,3975 6990.19,4108.37 7126.52,4108.37 v1(7151.52,4083.37) ; v1@7142.02,4083.37 ccw(c7119.09,4083.37) 7135.31,4099.59 ccw(c7151.52,4115.81) v1@7151.52,4092.87 ; v1@7146.02,4083.37 ccw(c7132.75,4083.37) 7142.14,4092.76 ccw(c7151.52,4102.15) v1@7151.52,4088.87 ; v1@7565.19,4682.21 cw(c7565.19,4659.27) 7581.41,4675.49 cw(c7597.63,4691.71) v1@7574.69,4691.71 ; v1@7565.19,4686.21 cw(c7565.19,4672.93) 7574.58,4682.32 cw(c7583.97,4691.71) v1@7570.69,4691.71 ; v1(7565.19,4691.71) 7640.19,4616.71 7640.19,4476.71 7651.52,4465.37 7751.52,4465.37 v2(7771.26,4445.63) ; v2@7760.26,4445.63 ccw(c7733.7,4445.63) 7752.48,4464.41 ccw(c7771.26,4483.19) v2@7771.26,4456.63 ; v2@7764.26,4445.63 ccw(c7747.36,4445.63) 7759.31,4457.58 ccw(c7771.26,4469.53) v2@7771.26,4452.63
DB_MEM.BUS_D13: U7.G6 U8.P20 U12.50 U16.36 U61.56 | length 7321.3
  Top Layer w4: U8.P20@5645.91,4162.81 cw(c5645.91,4144.71) 5658.71,4157.51 cw(c5671.51,4170.31) U8.P20@5653.41,4170.31 ; U8.P20@5645.91,4162.97 cw(c5645.91,4145.25) 5658.44,4157.78 cw(c5670.97,4170.31) U8.P20@5653.25,4170.31 ; U8.P20@5645.91,4170.31 v3(5665.59,4150.63) ; U61.56@6351.93,2626.62 6365.12,2626.61 6365.12,2626.71 v1(6390.19,2626.71) ; U61.56@6367.95,2623.79 cw(c6374.99,2616.75) 6374.99,2626.71 ; U61.56@6367.95,2629.45 ccw(c6374.57,2636.07) 6374.57,2626.71 ; v1@6383.47,2619.99 ccw(c6367.26,2603.77) 6367.26,2626.71 ccw(c6367.26,2649.64) v1@6383.47,2633.43 ; v1@6386.3,2622.82 ccw(c6376.91,2613.43) 6376.91,2626.71 ccw(c6376.91,2639.99) v1@6386.3,2630.6 ; U12.50@7294.41,4048.46 7332.28,4048.46 v1(7345.19,4061.37) ; U16.36@7294.41,4718.74 7306.86,4718.73 7306.86,4716.71 7348.52,4716.71 7365.19,4700.04 7365.19,4375.04 7415.19,4325.04 v1(7415.19,4250.04) ; U16.36@7314.8,4721.57 ccw(c7326.53,4733.3) 7326.53,4716.71 ; U12.50@7317.63,4042.81 cw(c7331.28,4029.15) 7331.28,4048.46 cw(c7331.28,4067.78) U12.50@7317.63,4054.12 ; U16.36@7317.63,4713.08 cw(c7326.38,4704.33) 7326.38,4716.71 ; U16.36@7317.63,4724.4 ccw(c7336.19,4742.96) 7336.19,4716.71 ; v1@7408.47,4256.76 ccw(c7392.26,4272.98) 7415.19,4272.98 ccw(c7438.13,4272.98) v1@7421.91,4256.76 ; v1@7411.3,4253.93 ccw(c7401.91,4263.32) 7415.19,4263.32 ccw(c7428.47,4263.32) v1@7419.08,4253.93 ; 5652.79,4163.43 cw(c5639.98,4150.63) 5658.09,4150.63 ccw(c5639.98,4150.63) 5652.79,4163.43 ; 5652.79,4163.43 ccw(c5665.59,4176.24) 5665.59,4158.13 cw(c5665.59,4176.24) 5652.79,4163.43
  Top Layer w8: v2(7731.89,4406.26) U7.G6@7751.58,4425.94 ; v2@7731.89,4415.26 ccw(c7731.89,4436.99) 7747.25,4421.62 ccw(c7762.62,4406.26) v2@7740.89,4406.26 ; U7.G6@7745.58,4425.94 cw(c7731.09,4425.94) 7741.33,4415.7 cw(c7751.58,4405.46) U7.G6@7751.58,4419.94
  MidLayer1 w4: v1(7345.19,4061.37) 7398.52,4114.71 7398.52,4166.71 7390.19,4175.04 7390.19,4225.04 v1(7415.19,4250.04) ; v1@7345.19,4066.87 ccw(c7345.19,4080.15) 7354.58,4070.76 ccw(c7363.97,4061.37) v1@7350.69,4061.37 ; v1@7345.19,4070.87 ccw(c7345.19,4093.81) 7361.41,4077.59 ccw(c7377.63,4061.37) v1@7354.69,4061.37 ; v1@7405.69,4250.04 cw(c7382.76,4250.04) 7398.97,4233.82 cw(c7415.19,4217.61) v1@7415.19,4240.54 ; v1@7409.69,4250.04 cw(c7396.41,4250.04) 7405.8,4240.65 cw(c7415.19,4231.26) v1@7415.19,4244.54
  MidLayer2 w4: v3@5666.24,4143.16 cw(c5667.82,4125.12) 5679.46,4138.99 cw(c5691.1,4152.86) v3@5673.06,4151.28 ; 5679.17,4139.24 ccw(c5689.1,4149.17) 5689.1,4135.12 5782.64,4135.12 5910,4135.12 5920,4135.12 5951.87,4135.12 6025.12,4208.37 6061.63,4208.37 6080,4190 6140.88,4190 6166.5,4164.37 6381.86,4164.37 6404.52,4141.71 6486.86,4141.71 6520.19,4175.04 6581.86,4175.04 6648.52,4108.37 6681.86,4108.37 6698.52,4091.71 6823.52,4091.71 6848.52,4116.71 6948.52,4116.71 6998.52,4066.71 6998.52,3970.37 7011.52,3957.37 7040.19,3957.37 7041.19,3958.37 7242.19,3958.37 v1(7345.19,4061.37) 7543.19,4061.37 7581.86,4100.04 7665.19,4100.04 7690.19,4075.04 7690.19,4058.37 7665.19,4033.37 7409.23,4033.37 7317.56,3941.71 7165.19,3941.71 7156.86,3933.37 7156.86,3907.37 7165.19,3899.04 7232.86,3899.04 7265.19,3866.71 7265.19,3587.04 7236.52,3558.37 7186.52,3558.37 7148.52,3520.37 7148.52,3161.35 7090.52,3103.35 7090.52,2837 7048.52,2795 7048.52,2733.37 v1(6993.52,2678.37) ; v1@6993.52,2683.87 ccw(c6993.52,2697.15) 7002.91,2687.76 ccw(c7012.3,2678.37) v1@6999.02,2678.37 ; v1@6993.52,2687.87 ccw(c6993.52,2710.81) 7009.74,2694.59 ccw(c7025.96,2678.37) v1@7003.02,2678.37 ; v1@7335.69,4061.37 cw(c7312.76,4061.37) 7328.97,4045.16 cw(c7345.19,4028.94) v1@7345.19,4051.87 ; v1@7339.69,4061.37 cw(c7326.41,4061.37) 7335.8,4051.99 cw(c7345.19,4042.6) v1@7345.19,4055.87 ; v1@7349.08,4057.49 cw(c7358.47,4048.1) 7358.47,4061.37 cw(c7358.47,4074.65) v1@7349.08,4065.26 ; v1@7351.91,4054.66 cw(c7368.13,4038.44) 7368.13,4061.37 cw(c7368.13,4084.31) v1@7351.91,4068.09 ; v1(7415.19,4250.04) 7440.19,4275.04 7648.52,4275.04 7665.19,4291.71 7665.19,4373.37 7678.52,4386.71 7712.34,4386.71 v2(7731.89,4406.26) ; v1@7415.19,4255.54 ccw(c7415.19,4268.82) 7424.58,4259.43 ccw(c7433.97,4250.04) v1@7420.69,4250.04 ; v1@7415.19,4259.54 ccw(c7415.19,4282.48) 7431.41,4266.26 ccw(c7447.63,4250.04) v1@7424.69,4250.04 ; v2@7720.89,4406.26 cw(c7694.33,4406.26) 7713.11,4387.48 cw(c7731.89,4368.7) v2@7731.89,4395.26 ; v2@7724.89,4406.26 cw(c7707.99,4406.26) 7719.94,4394.31 cw(c7731.89,4382.36) v2@7731.89,4399.26
  Bottom Layer w4: v1@6385.64,2635.05 ccw(c6381.47,2642.71) 6390.19,2642.71 ; v1(6390.19,2626.71) 6390.19,2642.71 ; v1@6394.74,2635.05 cw(c6398.91,2642.71) 6390.19,2642.71 ; v1@6986.81,2671.66 ccw(c6970.59,2655.44) 6970.59,2678.37 ccw(c6970.59,2701.31) v1@6986.81,2685.09 ; v1@6989.64,2674.49 ccw(c6980.25,2665.1) 6980.25,2678.37 ccw(c6980.25,2691.65) v1@6989.64,2682.26 ; v1(6993.52,2678.37) 6901.86,2678.37 6894.86,2671.37 6764.37,2671.37 6712.71,2723.04 6494.31,2723.04 6462.98,2691.71 6439.19,2691.71 6390.19,2642.71
DB_MEM.BUS_D14: U7.F6 U8.P22 U12.51 U16.37 U61.57 | length 6967.9
  Top Layer w4: U8.P22@5724.65,4162.81 cw(c5724.65,4144.71) 5737.45,4157.51 cw(c5750.25,4170.31) U8.P22@5732.15,4170.31 ; U8.P22@5724.65,4162.97 cw(c5724.65,4145.25) 5737.18,4157.78 cw(c5749.71,4170.31) U8.P22@5731.99,4170.31 ; U8.P22@5724.65,4170.31 v3(5744.33,4150.63) ; U61.57@6351.93,2646.31 6406.86,2646.31 6420.19,2632.97 v1(6420.19,2596.71) ; U61.57@6367.95,2643.48 cw(c6374.78,2636.65) 6374.78,2646.31 cw(c6374.78,2655.96) U61.57@6367.95,2649.13 ; v1@6413.47,2603.43 ccw(c6397.26,2619.64) 6420.19,2619.64 ccw(c6443.13,2619.64) v1@6426.91,2603.43 ; v1@6416.3,2600.6 ccw(c6406.91,2609.99) 6420.19,2609.99 ccw(c6433.47,2609.99) v1@6424.08,2600.6 ; v1(7248.52,4065.37) 7263.11,4079.96 ; U12.51@7269.89,4076.01 ccw(c7263.11,4072.16) 7263.11,4079.96 ; U12.51@7269.89,4083.91 cw(c7263.11,4087.76) 7263.11,4079.96 ; U16.37@7294.41,4750.24 U16.37@7311.96,4750.24 ; U16.37@7311.97,4746.24 cw(c7311.97,4709.15) 7338.19,4735.37 ; U16.37@7311.97,4754.24 cw(c7311.97,4736.47) 7324.53,4749.03 ; U12.51@7317.63,4074.3 cw(c7331.28,4060.65) 7331.28,4079.96 cw(c7331.28,4099.27) U12.51@7317.63,4085.62 ; 7331.36,4742.2 ccw(c7311.97,4722.81) U16.37@7311.97,4750.24 ; v1@7370.02,4147.37 cw(c7347.09,4147.37) 7363.31,4131.16 cw(c7379.52,4114.94) v1@7379.52,4137.87 ; v1@7374.02,4147.37 cw(c7360.75,4147.37) 7370.14,4137.99 cw(c7379.52,4128.6) v1@7379.52,4141.87 ; v1(7379.52,4147.37) 7345.52,4113.37 7345.52,4091.63 7333.86,4079.96 U12.51@7294.41,4079.96 7263.11,4079.96 ; v1(7431.86,4192.04) 7462.19,4222.37 7462.19,4502.19 7423.52,4540.86 7423.52,4560 7462.19,4598.67 7462.19,4775.06 7437.21,4800.04 7381.86,4800.04 7365.19,4783.37 7365.19,4750.04 7348.52,4733.37 7340.19,4733.37 7315.19,4758.37 7311.96,4758.37 U16.37@7311.96,4750.24 ; v1@7431.86,4197.54 ccw(c7431.86,4210.82) 7441.25,4201.43 ccw(c7450.64,4192.04) v1@7437.36,4192.04 ; v1@7431.86,4201.54 ccw(c7431.86,4224.48) 7448.07,4208.26 ccw(c7464.29,4192.04) v1@7441.36,4192.04 ; 5731.53,4163.43 cw(c5718.72,4150.63) 5736.83,4150.63 ccw(c5718.72,4150.63) 5731.53,4163.43 ; 5731.53,4163.43 ccw(c5744.33,4176.24) 5744.33,4158.13 cw(c5744.33,4176.24) 5731.53,4163.43
  Top Layer w8: v2(7771.26,4406.26) U7.F6@7790.95,4425.94 ; v2@7771.26,4415.26 ccw(c7771.26,4436.99) 7786.62,4421.62 ccw(c7801.99,4406.26) v2@7780.26,4406.26 ; U7.F6@7784.95,4425.94 cw(c7770.46,4425.94) 7780.7,4415.7 cw(c7790.95,4405.46) U7.F6@7790.95,4419.94
  MidLayer1 w4: v3@5744.98,4143.16 cw(c5746.56,4125.12) 5758.2,4138.99 cw(c5769.84,4152.86) v3@5751.8,4151.28 ; 5757.91,4139.24 ccw(c5767.84,4149.17) 5767.84,4135.12 5861.38,4135.12 5910,4135.12 5920,4135.12 5924.74,4135.12 5936.86,4135.12 5960.11,4158.37 6073.52,4158.37 6090.19,4175.04 v1(6090.19,4208.37) ; v1@6083.47,4201.66 cw(c6067.26,4185.44) 6090.19,4185.44 cw(c6113.13,4185.44) v1@6096.91,4201.66 ; v1@6086.3,4204.49 cw(c6076.91,4195.1) 6090.19,4195.1 cw(c6103.47,4195.1) v1@6094.08,4204.49 ; v1(6998.52,2766.71) 7059.82,2828 7172.89,2828 7248.52,2903.63 7248.52,3010 7248.52,3064.34 7282.19,3098 7282.19,3849.71 7273.52,3858.37 7231.86,3900.04 7231.86,3922.71 7248.52,3939.37 v1(7248.52,4065.37) ; v1@6998.52,2772.21 ccw(c6998.52,2785.49) 7007.91,2776.1 ccw(c7017.3,2766.71) v1@7004.02,2766.71 ; v1@6998.52,2776.21 ccw(c6998.52,2799.14) 7014.74,2782.93 ccw(c7030.96,2766.71) v1@7008.02,2766.71 ; v1@7241.81,4058.66 cw(c7225.59,4042.44) 7248.52,4042.44 cw(c7271.46,4042.44) v1@7255.24,4058.66 ; v1@7244.64,4061.49 cw(c7235.25,4052.1) 7248.52,4052.1 cw(c7261.8,4052.1) v1@7252.41,4061.49
  MidLayer2 w4: v1(7431.86,4192.04) 7682.19,4192.04 7752.19,4262.04 7752.19,4387.19 v2(7771.26,4406.26) ; v1@7435.75,4188.15 cw(c7445.14,4178.76) 7445.14,4192.04 cw(c7445.14,4205.32) v1@7435.75,4195.93 ; v1@7438.57,4185.32 cw(c7454.79,4169.11) 7454.79,4192.04 cw(c7454.79,4214.98) v1@7438.57,4198.76 ; v2@7760.26,4406.26 cw(c7733.7,4406.26) 7752.48,4387.48 cw(c7771.26,4368.7) v2@7771.26,4395.26 ; v2@7764.26,4406.26 cw(c7747.36,4406.26) 7759.31,4394.31 cw(c7771.26,4382.36) v2@7771.26,4399.26
  Bottom Layer w4: v1@6090.19,4198.87 cw(c6090.19,4175.94) 6106.41,4192.16 cw(c6122.63,4208.37) v1@6099.69,4208.37 ; v1@6090.19,4202.87 cw(c6090.19,4189.6) 6099.58,4198.99 cw(c6108.97,4208.37) v1@6095.69,4208.37 ; v1(6090.19,4208.37) 6106.86,4191.71 6156.86,4191.71 6184.19,4164.37 6400.86,4164.37 6415.19,4150.04 6481.86,4150.04 6508.19,4176.37 6698.52,4176.37 6732.86,4142.04 6981.04,4142.04 6993.5,4142.04 7035.5,4184.04 7342.86,4184.04 7351.86,4175.04 v1(7379.52,4147.37) 7424.19,4192.04 v1(7431.86,4192.04) ; v1(6420.19,2596.71) 6420.19,2605.04 6450.52,2635.37 6481.86,2635.37 6492.19,2625.04 6672.52,2625.04 6710.86,2663.37 6895,2663.37 6900,2658.37 6998.52,2658.37 7015.19,2675.04 7015.19,2750.04 v1(6998.52,2766.71) ; v1@6421.69,2596.71 cw(c6445.43,2596.71) 6428.64,2613.49 ; v1@6425.69,2596.71 cw(c6459.09,2596.71) 6435.47,2620.32 ; v1@6429.69,2596.71 cw(c6472.74,2596.71) 6442.3,2627.15 ; v1@6998.52,2757.21 cw(c6998.52,2734.27) 7014.74,2750.49 cw(c7030.96,2766.71) v1@7008.02,2766.71 ; v1@6998.52,2761.21 cw(c6998.52,2747.93) 7007.91,2757.32 cw(c7017.3,2766.71) v1@7004.02,2766.71 ; v1@7370.02,4147.37 ccw(c7347.09,4147.37) 7363.31,4163.59 ccw(c7379.52,4179.81) 7379.52,4156.87 ccw(c7379.52,4179.81) 7395.74,4163.59 ccw(c7411.96,4147.37) v1@7389.02,4147.37 ; v1@7374.02,4147.37 ccw(c7360.75,4147.37) 7370.13,4156.76 ccw(c7379.52,4166.15) 7379.52,4152.87 ccw(c7379.52,4166.15) 7388.91,4156.76 ccw(c7398.3,4147.37) v1@7385.02,4147.37 ; 7402.55,4170.4 cw(c7431.86,4141.1) v1@7431.86,4182.54 ; 7409.38,4177.23 cw(c7431.86,4154.75) v1@7431.86,4186.54 ; 7416.21,4184.06 cw(c7431.86,4168.41) v1@7431.86,4190.54
DB_MEM.BUS_D15: U7.G7 U8.P26 U12.53 U16.38 U61.58 | length 6483
  Top Layer w4: U8.P26@5882.13,4170.31 5910,4170.31 5920,4170.31 6010,4170.31 6023.06,4183.37 v1(6056.86,4183.37) ; U8.P26@5887.32,4165.12 cw(c5899.85,4152.59) 5899.85,4170.31 cw(c5899.85,4188.04) U8.P26@5887.32,4175.51 ; U8.P26@5887.43,4165.01 cw(c5900.23,4152.21) 5900.23,4170.31 cw(c5900.23,4188.42) U8.P26@5887.43,4175.62 ; v1@6050.14,4176.66 ccw(c6033.92,4160.44) 6033.92,4183.37 ccw(c6033.92,4206.31) v1@6050.14,4190.09 ; v1@6052.97,4179.49 ccw(c6043.58,4170.1) 6043.58,4183.37 ccw(c6043.58,4196.65) v1@6052.97,4187.26 ; v1(6190.19,2516.71) 6215,2541.52 6215,2560 6320.99,2665.99 U61.58@6351.93,2665.99 ; v1@6190.19,2522.21 ccw(c6190.19,2535.49) 6199.58,2526.1 ccw(c6208.97,2516.71) v1@6195.69,2516.71 ; v1@6190.19,2526.21 ccw(c6190.19,2549.14) 6206.41,2532.93 ccw(c6222.63,2516.71) v1@6199.69,2516.71 ; U61.58@6335.91,2663.16 ccw(c6329.08,2656.33) 6329.08,2665.99 ccw(c6329.08,2675.65) U61.58@6335.91,2668.82 ; v1(7246.52,4125.04) 7264.44,4142.95 ; v1@7246.52,4130.54 ccw(c7246.52,4143.82) 7255.91,4134.43 ccw(c7265.3,4125.04) v1@7252.02,4125.04 ; v1@7246.52,4134.54 ccw(c7246.52,4157.48) 7262.74,4141.26 ccw(c7278.96,4125.04) v1@7256.02,4125.04 ; U12.53@7269.57,4139.65 ccw(c7264.44,4137.32) 7264.44,4142.95 ; U12.53@7269.57,4146.26 cw(c7264.44,4148.59) 7264.44,4142.95 ; U16.38@7294.41,4781.73 7332.19,4781.73 7340.19,4773.73 v1(7340.19,4758.37) ; U12.53@7314.35,4146.17 ccw(c7318.06,4151.16) 7322.45,4146.76 ; U12.53@7316.74,4149.38 ccw(c7320.85,4154.92) 7325.73,4150.04 ; U16.38@7317.63,4776.08 cw(c7331.28,4762.42) 7331.28,4781.73 cw(c7331.28,4801.05) U16.38@7317.63,4787.39 ; U12.53@7319.73,4141.03 cw(c7322.19,4140.42) 7322.19,4142.95 ; U12.53@7319.73,4144.87 ccw(c7322.19,4145.48) 7322.19,4142.95 ; 7322.96,4147.26 cw(c7331.1,4139.11) v1@7337.37,4148.78 ; 7326.45,4150.76 cw(c7333.85,4143.36) v1@7339.55,4152.14 ; v1(7338.19,4150.04) 7325.74,4150.04 ; 7264.44,4142.95 7322.19,4142.95 ; 7322.19,4142.95 7322.19,4146.5 7325.74,4150.04
  Top Layer w8: v2(7731.89,4366.89) U7.G7@7751.57,4386.57 ; v2@7731.89,4375.89 ccw(c7731.89,4397.62) 7747.25,4382.25 ccw(c7762.62,4366.89) v2@7740.89,4366.89 ; U7.G7@7745.57,4386.57 cw(c7731.09,4386.57) 7741.33,4376.33 cw(c7751.57,4366.09) U7.G7@7751.57,4380.57
  MidLayer1 w4: v1@6548.14,2460.09 ccw(c6531.92,2476.31) 6554.86,2476.31 ccw(c6577.79,2476.31) v1@6561.57,2460.09 ; v1@6550.97,2457.26 ccw(c6541.58,2466.65) 6554.86,2466.65 ccw(c6568.14,2466.65) v1@6558.75,2457.26 ; v1(6554.86,2453.37) 6554.86,2478.39 6790.19,2713.73 6790.19,2794.08 7274.19,3278.08 7274.19,3846.37 7223.52,3897.04 7223.52,3958.37 7231.86,3966.71 7231.86,4008.37 7223.52,4016.71 7223.52,4102.04 v1(7246.52,4125.04) 7246.52,4293.73 7281.86,4329.06 7281.86,4746.86 7293.37,4758.37 v1(7340.19,4758.37) ; v1@7237.02,4125.04 cw(c7214.09,4125.04) 7230.31,4108.82 cw(c7246.52,4092.61) v1@7246.52,4115.54 ; v1@7239.81,4131.76 ccw(c7223.59,4147.98) 7246.52,4147.98 ccw(c7269.46,4147.98) v1@7253.24,4131.76 ; v1@7241.02,4125.04 cw(c7227.75,4125.04) 7237.14,4115.65 cw(c7246.52,4106.26) v1@7246.52,4119.54 ; v1@7242.64,4128.93 ccw(c7233.25,4138.32) 7246.52,4138.32 ccw(c7259.8,4138.32) v1@7250.41,4128.93 ; v1@7333.47,4751.66 ccw(c7317.26,4735.44) 7317.26,4758.37 ccw(c7317.26,4781.31) v1@7333.47,4765.09 ; v1@7336.3,4754.49 ccw(c7326.91,4745.1) 7326.91,4758.37 ccw(c7326.91,4771.65) v1@7336.3,4762.26
  MidLayer2 w4: v1(7338.19,4150.04) 7413.19,4225.04 7433.52,4225.04 7458.52,4250.04 7687.86,4250.04 7712.78,4274.97 7712.78,4347.78 7713.04,4347.78 7722.38,4357.12 7722.38,4357.37 v2(7731.89,4366.89) ; v1@7338.19,4155.54 ccw(c7338.19,4168.82) 7347.58,4159.43 ccw(c7356.97,4150.04) v1@7343.69,4150.04 ; v1@7338.19,4159.54 ccw(c7338.19,4182.48) 7354.41,4166.26 ccw(c7370.63,4150.04) v1@7347.69,4150.04 ; 7713.17,4347.91 ccw(c7694.53,4366.55) v2@7720.89,4366.79 ; 7713.55,4348.29 cw(c7731.89,4329.96) v2@7731.89,4355.89 ; 7719.91,4354.65 ccw(c7707.9,4366.67) v2@7724.89,4366.83 ; 7720.38,4355.12 cw(c7731.89,4343.62) v2@7731.89,4359.89
  Bottom Layer w4: v1(6056.86,4183.37) 6153.88,4183.37 6181.54,4155.71 6392.86,4155.71 6423.52,4125.04 6472.19,4125.04 6514.86,4167.71 6580.86,4167.71 6613.86,4134.71 6710.67,4134.71 ; v1@6060.75,4179.49 cw(c6070.14,4170.1) 6070.14,4183.37 cw(c6070.14,4196.65) v1@6060.75,4187.26 ; v1@6063.57,4176.66 cw(c6079.79,4160.44) 6079.79,4183.37 cw(c6079.79,4206.31) v1@6063.57,4190.09 ; v1@6190.19,2507.21 cw(c6190.19,2484.27) 6206.41,2500.49 cw(c6222.63,2516.71) v1@6199.69,2516.71 ; v1@6190.19,2511.21 cw(c6190.19,2497.93) 6199.58,2507.32 cw(c6208.97,2516.71) v1@6195.69,2516.71 ; v1(6190.19,2516.71) 6231.86,2475.04 6263.52,2475.04 6280.19,2458.37 6428.88,2458.37 6462.21,2491.71 6516.52,2491.71 v1(6554.86,2453.37) ; v1@6545.36,2453.37 ccw(c6522.42,2453.37) 6538.64,2469.59 ccw(c6554.86,2485.81) v1@6554.86,2462.87 ; v1@6549.36,2453.37 ccw(c6536.08,2453.37) 6545.47,2462.76 ccw(c6554.86,2472.15) v1@6554.86,2458.87 ; 6710.67,4134.04 7216,4134.04 7225,4125.04 ; v1@7239.51,4118.64 ccw(c7225,4105.41) 7225,4125.04 ; v1@7239.51,4131.44 cw(c7225,4144.67) 7225,4125.04 ; v1@7242.46,4121.33 ccw(c7234.06,4113.68) 7234.06,4125.04 ccw(c7234.06,4136.41) v1@7242.46,4128.75 ; v1(7246.52,4125.04) 7225,4125.04
DB_MEM.BUS_D16: U8.P18 U13.2 U17.7 U61.60 | length 4072.6
  Top Layer w4: U8.P18@5567.17,4162.81 cw(c5567.17,4144.71) 5579.97,4157.51 cw(c5592.77,4170.31) U8.P18@5574.67,4170.31 ; U8.P18@5567.17,4162.97 cw(c5567.17,4145.25) 5579.7,4157.78 cw(c5592.23,4170.31) U8.P18@5574.51,4170.31 ; U8.P18@5567.17,4170.31 v3(5586.85,4150.63) ; v1(6090.19,4125.04) 6117.24,4125.04 6124.57,4132.37 6135,4132.37 6145.58,4142.95 U13.2@6170.59,4142.95 ; v1@6094.08,4121.15 cw(c6103.47,4111.76) 6103.47,4125.04 cw(c6103.47,4138.32) v1@6094.08,4128.93 ; v1@6096.91,4118.32 cw(c6113.13,4102.11) 6113.13,4125.04 cw(c6113.13,4147.98) v1@6096.91,4131.76 ; 6136.71,4134.08 cw(c6149.26,4121.53) U13.2@6152.34,4139.01 ; 6142.14,4139.52 cw(c6150.89,4130.77) U13.2@6153.03,4142.95 ; U17.7@6170.59,4781.73 6193.02,4781.73 6205,4793.71 ; U17.7@6189.09,4785.62 ccw(c6191.81,4796.82) 6199.96,4788.67 ; U17.7@6190.04,4789.51 ccw(c6193.78,4804.93) 6205,4793.71 ; U17.7@6196.15,4781.73 cw(c6203.7,4781.73) 6198.36,4787.07 ; U61.60@6351.93,2705.36 6378.84,2705.36 v1(6398.52,2725.04) ; U61.60@6367.95,2702.53 cw(c6374.78,2695.7) 6374.78,2705.36 cw(c6374.78,2715.02) U61.60@6367.95,2708.19 ; v1@6375.14,4090.09 ccw(c6357.31,4107.92) 6382.52,4107.92 ; v1@6377.97,4087.26 ccw(c6366.97,4098.26) 6382.52,4098.26 ; v1(6381.86,4083.37) 6382.52,4084.04 6382.52,4415.04 6398.52,4431.04 6398.52,4608.37 6373.52,4633.37 6373.52,4741.37 6321.19,4793.71 6205,4793.71 ; 6382.52,4095.04 ccw(c6393.53,4095.04) v1@6385.75,4087.26 ; 6382.52,4104.7 ccw(c6403.18,4104.7) v1@6388.57,4090.09 ; v1@6389.02,2725.04 cw(c6366.09,2725.04) 6382.31,2708.82 cw(c6398.52,2692.61) v1@6398.52,2715.54 ; v1@6393.02,2725.04 cw(c6379.75,2725.04) 6389.13,2715.65 cw(c6398.52,2706.26) v1@6398.52,2719.54 ; 5574.05,4163.43 cw(c5561.24,4150.63) 5579.35,4150.63 ccw(c5561.24,4150.63) 5574.05,4163.43 ; 5574.05,4163.43 ccw(c5586.85,4176.24) 5586.85,4158.13 cw(c5586.85,4176.24) 5574.05,4163.43
  MidLayer1 w4: v1(6381.86,4083.37) 6383.52,4085.04 6490.19,4085.04 6497.19,4078.04 6497.19,3673.71 6490.19,3666.71 6490.19,3375.37 6448.52,3333.71 6448.52,3242.71 6456.86,3234.37 6456.86,3217.71 6448.52,3209.37 6425.19,3209.37 6422.86,3207.04 6422.86,2995.37 6455,2963.23 6455,2813.09 6415.19,2773.28 6415.19,2741.71 v1(6398.52,2725.04) ; v1@6385.75,4079.49 cw(c6399.16,4066.07) 6399.16,4085.04 ; v1@6388.57,4076.66 cw(c6408.81,4056.42) 6408.81,4085.04 ; v1@6388.57,4090.09 ccw(c6400.77,4102.29) 6400.77,4085.04 ; v1@6398.52,2730.54 ccw(c6398.52,2743.82) 6407.91,2734.43 ccw(c6417.3,2725.04) v1@6404.02,2725.04 ; v1@6398.52,2734.54 ccw(c6398.52,2757.48) 6414.74,2741.26 ccw(c6430.96,2725.04) v1@6408.02,2725.04
  MidLayer2 w4: v1(6090.19,4125.04) 6117.24,4125.04 6124.57,4132.37 6132.86,4132.37 6161.52,4103.71 6234.86,4103.71 6239.52,4099.04 6308.85,4099.04 6312.62,4102.81 6327.38,4102.81 6331.15,4099.04 6366.19,4099.04 v1(6381.86,4083.37) ; v1@6094.08,4121.15 cw(c6103.47,4111.76) 6103.47,4125.04 cw(c6103.47,4138.32) v1@6094.08,4128.93 ; v1@6096.91,4118.32 cw(c6113.13,4102.11) 6113.13,4125.04 cw(c6113.13,4147.98) v1@6096.91,4131.76
  Bottom Layer w4: v3@5587.5,4143.16 cw(c5589.08,4125.12) 5600.72,4138.99 cw(c5612.36,4152.86) v3@5594.32,4151.28 ; 5600.43,4139.24 ccw(c5610.36,4149.17) 5610.36,4135.12 5703.9,4135.12 5910,4135.12 5920,4135.12 5951.87,4135.12 5966.79,4150.04 6065.19,4150.04 v1(6090.19,4125.04) ; v1@6080.69,4125.04 ccw(c6057.76,4125.04) 6073.97,4141.26 ccw(c6090.19,4157.48) v1@6090.19,4134.54 ; v1@6084.69,4125.04 ccw(c6071.41,4125.04) 6080.8,4134.43 ccw(c6090.19,4143.82) v1@6090.19,4130.54